# Altium PCB DriveWirePCB.PcbDoc (part 3 of 3)
Units mm, origin at the board's own origin, x right, y up, seen from the top; angles counter-clockwise.
Board outline 57.5 x 124.12 mm, 4 copper layers (Top Layer, GND, PWR, Bottom Layer), stack 1.57 mm thick; 111 components, 71 nets, 388 pads, 260 vias.
Unrouted connection lines stored in the file: 101.
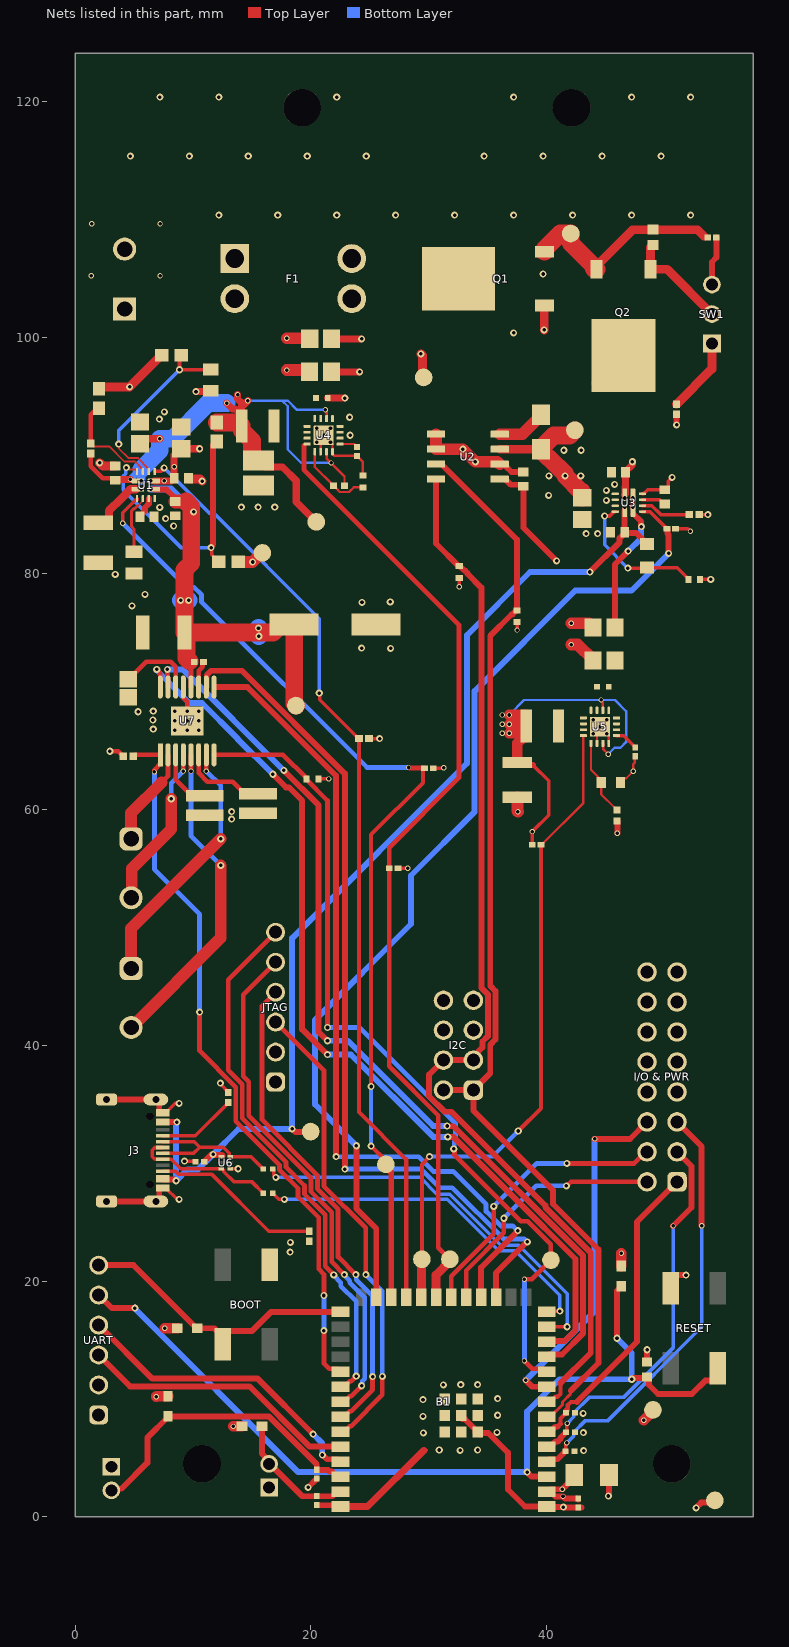
[diagram p4: the nets of this part, all layers, seen from the top]

## Via types
v1: diameter 0.6, hole 0.3, Top Layer to Bottom Layer, tented both sides, 160 vias
v2: diameter 0.45, hole 0.3, Top Layer to Bottom Layer, tented both sides, 56 vias
v3: diameter 0.6, hole 0.3, Top Layer to Bottom Layer, 26 vias
v4: diameter 0.5, hole 0.3, Top Layer to Bottom Layer, 10 vias
v5: diameter 0.4, hole 0.3, Top Layer to Bottom Layer, 8 vias

## Nets (pads, with @x,y where several pads share a name; then routed paths per layer and width w, separated by ;. In a path a pad name is that pad's centre, name@x,y a point inside that pad or via, vN(x,y) a via of type N, cw(c..) or ccw(c..) an arc to the next point about the centre after c; other vN are vias at no path point)
3V3: "I/O & PWR.8" "I/O & PWR.10" "I/O & PWR.12" "I/O & PWR.14" "I/O & PWR.16" B1.2 C8.1 C18.2 C23.2 C24.2 I2C.5 I2C.6 JTAG.2 L2.2 R4.1 R5.1 R12.2 R16.2 R18.2 R20.1 R21.2 R23.2 R24.2 R27.1 R28.1 R29.2 TP7.1 U2.5 U5.7 U5.14 UART.2 | length 62.3
  Top Layer w0.2: v2(44.6,69.275) 44.6,69.207 44.75,69.057 U5.14@44.75,68.4 ; U5.7@44.75,65.6 44.77,65.58 44.77,65.105 v2(45.2,64.675)
  Top Layer w0.3: R29.2@20.625,62.575 v2(21.5,62.575) ; R18.2@27.366,55 v2(28.2,55) ; R12.2@30.366,63.5 31.225,63.5 v2(31.25,63.525) ; v2(32.575,78.875) R4.1@32.575,79.625 ; v2(37.475,75.2) R5.1@37.475,75.875 ; R21.2@38.769,57 v2(38.769,58.119) 40.15,59.5 40.15,62.428 38.828,63.75 ; R16.2@50.906,83.8 51.95,83.8 v2(52.175,83.575)
  Top Layer w0.5: U2.5@36,88 36.475,88 36.95,87.525 37.875,87.525 C8.1@38,87.4 38,87.3 38.025,87.275 38.025,83.875 v1(40.825,81.075) ; C18.2@37.5,63.978 37.728,63.75 38.828,63.75 ; B1.2@40,2.15 40.3,2.15 40.713,1.737 v2(41.369,1.737) 41.531,1.575 42.572,1.575 C24.2@42.661,1.486 ; B1.2@40.3,2.35 v2(41.301,2.35) 42.325,3.374 C23.2@42.325,3.55 ; v2(45.975,57.975) 45.975,59.003 R20.1@45.986,59.014
  Top Layer w0.9: v2(6.875,10.2) 6.9,10.225 R28.1@7.875,10.225 ; v2(7.6,16) R23.2@8.65,16 ; v2(13.4,7.675) R27.1@14.15,7.675 ; v2(36.825,66.45) 38.225,66.45 L2.2@38.25,66.475 ; v2(36.825,67.225) 38.225,67.225 L2.2@38.25,67.2 ; v2(36.825,68) 38.225,68 38.25,67.975 L2.2@38.25,67.2 ; C18.2@37.5,63.978 37.5,65.598 38.027,66.125 38.225,66.125 38.25,66.15 L2.2@38.25,66.475 ; R24.2@46.3,21.275 46.3,22.325 v2(46.325,22.35) ; v2(48.225,8.2) 49,8.975 TP7.1@49,9.075 ; L2.2@38.25,66.475 L2.2@38.25,67.075 L2.2@38.25,67.2
  Bottom Layer w0.2: v2(36.825,68) 36.825,68.025 38.075,69.275 v2(44.6,69.275) 45.775,69.275 46.725,68.325 46.725,65.7 46.25,65.225 45.75,65.225 v2(45.2,64.675)
  other v2: 36.225,66.45 36.225,67.225 36.225,68
3V3_BUCK_IN: C19.1 C20.1 C21.1 U3.1 U3.8 U5.10 U5.11 U5.12 U5.13 | length 11.6
  Top Layer w0.5: C19.1@45.776,75.425 45.776,80.776 v1(46.9,81.9) ; v5(47.3,85.6) v5(47.3,86.4) ; U3.8@47.35,85.05 47.997,84.403 47.997,83.989 v1(48.016,83.97)
  Bottom Layer w0.5: v1(46.9,81.9) 47.997,82.997 47.997,83.95 v1(48.016,83.97)
3V3_PG: B1.22 R21.1 TP11.1 U5.4 | length 56.4
  Top Layer w0.2: R21.1@39.554,57 43.1,60.546 U5.4@43.1,66.25
  Top Layer w0.35: TP11.1@29.4,21.85 29.4,29.9 v1(30.05,30.55) ; v1(37.575,32.725) 39.5,34.65 R21.1@39.5,57
  Top Layer w0.75: B1.22@29.345,18.64 29.372,18.667 29.372,21.822 TP11.1@29.4,21.85
  Bottom Layer w0.35: v1(30.05,30.55) 35.4,30.55 v1(37.575,32.725)
6V: C2.2 C4.2 C16.1 L1.2 R1.2 R2.1 R17.1 TP5.1 U1.7 U4.7 U4.14 | length 56.8
  Top Layer w0.2: v2(21.225,93.875) 21.225,93.807 21.325,93.707 U4.14@21.325,93.125 ; U4.7@21.325,90.325 21.325,89.75 v2(21.7,89.375) 22.839,88.236 R17.1@22.839,87.45
  Top Layer w0.4: R1.2@1.325,90.175 1.325,89.1 2.35,88.075 3.225,88.075 C4.2@3.4,87.9
  Top Layer w0.6: C4.2@3.4,87.9 3.475,87.975 4.198,87.975 4.2,87.977 v2(4.693,87.977) ; C2.2@5.5,91 5.925,91.425 v2(7.175,91.425) ; v2(12.85,94.45) 13.348,93.952 13.598,93.952 14.125,93.425 14.125,94.45 13.775,94.8 v2(13.775,95.175) ; 14.3,94.3 v2(14.65,94.65) ; C16.1@15.55,89.576 16.101,89.024 17.587,89.024 18.75,87.861 18.75,86.075 TP5.1@20.45,84.375
  Top Layer w1.5: R2.1@12,92.801 13.85,92.801 14.125,92.526 L1.2@14.125,92.5 ; L1.2@14.125,92.125 14.997,91.253 14.997,89.677 15.098,89.576 C16.1@15.55,89.576
  Bottom Layer w0.2: v2(14.65,94.65) 17.55,94.65 ; v2(21.225,93.875) 18.825,93.875 18.05,94.65 17.55,94.65 ; v2(21.7,89.375) 19.175,89.375 18.025,90.525 18.025,94.175 17.55,94.65
  Bottom Layer w0.6: v2(4.693,87.977) 4.693,88.021 5.522,88.85 5.6,88.85
  Bottom Layer w0.7: v5(5.6,87.85) 5.6,88.85
  Bottom Layer w1.5: 5.6,88.85 7.175,90.425 v2(7.175,91.425) 8.275,91.425 11.3,94.45 v2(12.85,94.45)
6V_PG: B1.21 R18.1 TP9.1 U4.4 | length 82.7
  Top Layer w0.4: 19.4,90.85 19.4,88.8 32.55,75.65 32.55,62.675 26.634,56.759 R18.1@26.634,55 26.634,38.205 30.8,34.039 30.8,22.825 TP9.1@31.775,21.85
  Top Layer w0.75: B1.21@30.615,18.64 30.615,20.515 31.775,21.675 TP9.1@31.775,21.85
BOOST_SEL: B1.23 R9.2 U1.3 | length 80
  Top Layer w0.3: U1.3@6.75,88.65 7.25,88.65 v1(7.55,88.95) ; v1(20.7,69.85) 20.757,69.793 20.757,69.293 24.05,66 R9.2@24.075,66
  Top Layer w0.35: R9.2@24.075,66 24.075,34.325 28.075,30.325 B1.23@28.075,18.64
  Bottom Layer w0.3: v1(7.55,88.95) 11.442,85.058 11.815,85.058 20.7,76.174 v1(20.7,69.85)
BOOT: B1.27 BOOT.1 R23.1 UART.6 | length 24.5
  Top Layer w0.5: UART.6@2,21.35 4.95,21.35 10.3,16 R23.1@10.35,16 11.8,16 BOOT.1@12.5,15.3 ; BOOT.1@12.5,14.625 BOOT.1@12.5,15.3 ; B1.27@22.5,17.39 16.624,17.39 14.984,15.75 12.95,15.75 BOOT.1@12.5,15.3
ESP32_EN: B1.3 C28.2 R24.1 RESET.2 UART.5 | length 77.7
  Top Layer w0.5: UART.5@2,18.81 2.026,18.81 3.128,17.708 v1(5.075,17.708) ; v1(38.325,3.8) 38.705,3.42 B1.3@40,3.42 ; v1@45.95,15.177 45.95,19.175 46.3,19.525 R24.1@46.3,19.575 ; v1(47.2,11.675) 47.227,11.675 47.325,11.773 48.398,11.773 C28.2@48.5,11.875 48.543,11.875 48.668,11.75 48.668,11.182 49.425,10.425 52.3,10.425 53.432,11.557 54.05,11.557 54.5,12.007 RESET.2@54.5,12.625
  Bottom Layer w0.5: v1@5.075,17.775 5.075,17.641 18.916,3.8 v1(38.325,3.8) 38.325,8.925 41.075,11.675 v1(47.2,11.675) 47.2,13.9 v1(45.95,15.15)
GND: "I/O & PWR.7" "I/O & PWR.9" "I/O & PWR.11" "I/O & PWR.13" "I/O & PWR.15" B1.1 B1.40 B1.41 B1.42 B1.43 B1.44 B1.45 B1.46 B1.47 B1.48 B1.49 BOOT.4 C1.1 C2.1 C3.1 C4.1 C5.2 C6.1 C7.2 C8.2 C9.1 C10.1 C11.1 C12.2 C13.2 C14.2 C15.2 C16.2 C17.2 C18.1 C19.2 C20.2 C21.2 C22.2 C23.1 C24.1 C25.2 C26.2 C27.2 C28.1 C29.1 C30.1 C31.2 C32.1 C34.2 C35.1 I2C.7 I2C.8 J1.2 J2.1 J3.A1_B12 J3.B1_A12 J3.SH1 J3.SH2 J3.SH3 J3.SH4 J4.1 JTAG.1 Q1.1 R6.1 R7.1 R8.1 R9.1 R10.1 R13.1 R15.1 R19.2 R22.1 R30.2 R31.2 R32.1 R34.1 R35.2 R36.2 RESET.3 TP3.1 TP6.1 TP10.1 U1.12 U2.1 U2.2 U2.6 U3.3 U3.4 U3.5 U3.12 U4.6 U4.8 U4.15 U4.16 U4.17 U5.6 U5.8 U5.15 U5.16 U5.17 U6.4 U7.13 U7.17 UART.1 | length 109.9
  Top Layer w0.2: U4.6@20.825,90.325 20.825,91.475 v4(21.075,91.725) ; v4(21.655,91.145) 21.825,90.975 U4.8@21.825,90.325 21.825,90.145 21.999,89.971 C17.2@23.9,89.971 23.9,89.95 24.4,89.45 R19.2@24.4,88.3 ; U5.6@44.25,65.6 44.25,66.75 v4(44.5,67) ; v4(45.08,66.42) 45.25,66.25 U5.8@45.25,65.6 ; R22.1@46.245,62.275 46.245,62.345 46.54,62.64 46.74,62.64 v2(47.325,63.225) 47.325,63.822 47.445,63.942 47.445,64.445 C22.2@47.5,64.5
  Top Layer w0.3: J3.B1_A12@7.425,27.875 7.7,27.875 8.65,26.925 v1(8.825,26.925) ; J3.A1_B12@7.425,34.275 7.7,34.275 8.5,35.075 v1(8.825,35.075) ; v1(9.275,30.175) 9.3,30.15 10.168,30.15 C31.2@10.193,30.125 ; v1(12.325,36.79) 12.382,36.733 12.382,36.643 13,36.025 R36.2@13,36 ; U6.4@13.155,29.525 v1(13.825,29.525) ; R9.1@24.925,66 v1(25.825,66) ; 29.575,5.65 29.775,5.65 ; U3.12@48.1,86.75 48.2,86.75 48.55,87.1 C12.2@50,87.1 50.075,87.1 50.3,87.325 50.3,87.825 v1(50.625,88.15) ; R13.1@52.925,85 v1(53.65,85) ; R15.1@53,79.5 v1(53.9,79.5)
  Top Layer w0.4: v1(2.95,64.925) 3.65,64.925 R32.1@4.075,64.5 ; U7.13@9.175,70.375 9.179,70.371 9.179,69.462 9.5,69.141 v1(9.5,67.5)
  Top Layer w0.5: J3.SH4@2.67,26.755 J3.SH2@6.85,26.755 6.907,26.755 7.137,26.986 7.137,27.825 7.187,27.875 J3.B1_A12@7.425,27.875 ; J3.SH3@2.67,35.395 J3.SH1@6.85,35.395 6.907,35.395 7.137,35.164 7.137,34.325 7.187,34.275 J3.A1_B12@7.425,34.275 ; v1(19.75,2.5) 20.494,3.243 C30.1@20.5,3.243 ; C29.1@20.5,1 20.508,0.992 22.388,0.992 B1.40@22.5,0.88 ; B1.41@32.825,8.306 33.044,8.306 33.95,7.4 33.95,7.181 34.041,7.091 34.259,7.091 B1.43@34.35,7 ; B1.43@34.15,7.2 34.35,7.2 34.35,7.12 35.03,7.12 36.7,5.45 36.7,2.331 38.151,0.88 B1.1@40,0.88 40.036,0.844 41.381,0.844 v1(41.4,0.825) 41.427,0.825 41.456,0.796 C24.1@42.675,0.796 ; U2.6@36.475,89.27 36.525,89.22 36.525,89.086 37.011,88.6 C8.2@38,88.6 ; C24.1@42.675,0.8 42.95,0.8 ; v1(45.225,1.775) 45.278,1.828 C23.1@45.278,3.55 ; C28.1@48.5,13.125 v1(48.5,14.175) ; RESET.3@50.5,19.375 50.5,20.05 50.95,20.5 v1(51.8,20.5) ; v1(51,92.6) R34.1@51,93.5 ; v1(52.65,0.775) 53.084,1.209 54.059,1.209 TP10.1@54.25,1.4
  Top Layer w0.6: B1.40@22.5,0.88 24.805,0.88 29.575,5.65
  Top Layer w0.75: R6.1@2,95.825 v1(4.625,95.825) 7.3,98.5 R8.1@7.35,98.5 ; v1(2.075,89.375) 2.35,89.1 C4.1@3.4,89.1 ; C3.1@9.6,88.075 9.6,88 10.6,88 v1(10.775,87.825) ; v1(29.325,98.625) 29.45,98.5 29.45,96.725 TP3.1@29.55,96.625 ; v1(39.775,100.65) 39.775,102.695 Q1.1@39.8,102.72
  Top Layer w1: R10.1@13.825,81 13.85,80.975 14.458,80.975 v1(15.05,80.975) 15.825,81.75 TP6.1@15.875,81.75 ; v2(17.95,97.25) 19.724,97.25 C14.2@19.874,97.1 ; v2(17.95,99.95) 19.849,99.95 C13.2@19.899,99.9 ; U2.1@30.6,91.81 U2.2@30.6,90.54 v1(32.875,90.54) v1(33.945,89.47) 35.8,89.47 U2.6@36,89.27 ; C18.1@37.5,61.022 37.5,59.85 v2(37.55,59.8) ; v2(42.075,73.975) 42.625,73.975 43.924,72.676 C20.2@43.924,72.625 ; v2(42.075,75.775) 43.574,75.775 43.646,75.703 43.697,75.703 43.924,75.476 C19.2@43.924,75.425
  other v1: 43.125,5.625 32.65,5.65 30.875,5.675 34.125,5.675 29.525,7.125 43.1,7.15 35.775,7.175 29.5,8.525 35.825,8.625 43.075,8.775 29.5,9.95 35.825,10.025 31.225,11.2 32.7,11.225 34.125,11.225 18.225,22.45 18.25,23.275 13.275,59.175 13.275,59.8 8.45,66.7 9.5,66.7 10.5,66.7 6.625,66.8 8.45,67.5 10.475,67.5 6.6,67.575 5.35,68.275 6.625,68.325 8.45,68.325 9.5,68.32 10.475,68.325 26.75,73.65 24.3,73.675 4.825,77.25 24.325,77.55 26.725,77.6 5.925,78.225 3.4,79.925 43.325,83.375 44.3,83.375 8.35,84.025 7.675,84.65 7.175,85.6 14.1,85.625 15.525,85.625 16.925,85.625 45.05,86.2 45.05,87.05 45.75,87.55 7.139,93.086 7.575,93.7
  other v2: 1.375,105.255 7.2,105.255 1.4,109.655 7.2,109.655
  other v3: 37.184,100.395 39.684,105.395 12.184,110.395 17.184,110.395 22.184,110.395 27.184,110.395 32.184,110.395 37.184,110.395 42.184,110.395 47.184,110.395 52.184,110.395 4.684,115.395 9.684,115.395 14.684,115.395 19.684,115.395 24.684,115.395 34.684,115.395 39.684,115.395 44.684,115.395 49.684,115.395 7.184,120.395 12.184,120.395 22.184,120.395 37.184,120.395 47.184,120.395 52.184,120.395
  other v4: 43.92,66.42 43.92,67.58 45.08,67.58 20.495,91.145 20.495,92.305 21.655,92.305
I2C_SCL: B1.8 I2C.3 I2C.4 R4.2 U2.4 | length 91.6
  Top Layer w0.35: B1.8@40.3,9.77 40.72,10.19 40.916,10.19 41.15,10.424 41.15,11.325
  Top Layer w0.5: U2.4@30.6,88 30.6,82.55 32.525,80.625 32.625,80.625 32.975,80.275 33.041,80.275 33.275,80.041 33.275,79.975 34.45,78.8 34.45,44.862 34.995,44.317 34.995,40.763 34.55,40.318 34.55,39.821 33.77,39.041 I2C.3@33.77,38.73 I2C.4@31.23,38.73 30.005,37.505 30.005,35.683 31.33,34.358 31.922,34.358 39.872,26.408 39.872,26.266 43.725,22.413 43.725,13.9 41.15,11.325 ; B1.8@40,9.77 B1.8@40.3,9.77
I2C_SDA: B1.7 I2C.1 I2C.2 R5.2 U2.3 | length 94.8
  Top Layer w0.25: B1.7@40,8.5 40.3,8.5 40.795,8.995 40.814,8.995 41.325,9.506 41.325,9.753 42.025,10.453 42.025,10.7
  Top Layer w0.5: U2.3@30.6,89.27 31.075,89.27 37.475,82.87 R5.2@37.475,76.875 37.425,76.875 37.075,76.525 37.009,76.525 35.2,74.716 35.2,45.032 35.645,44.587 35.645,40.493 35.2,40.048 35.2,37.62 I2C.1@33.77,36.19 ; I2C.2@31.23,36.19 I2C.1@33.77,36.19 ; 42.025,10.7 44.375,13.05 44.375,22.683 40.522,26.536 40.522,27.705 33.77,34.458 I2C.1@33.77,36.19
IO4: "I/O & PWR.5" B1.4 C25.1 | length 36.6
  Top Layer w0.3: C25.1@41.596,5.575 41.596,6.171 v2(41.7,6.275)
  Top Layer w0.5: B1.4@40,4.69 40.2,4.89 40.911,4.89 41.583,5.561 41.589,5.561 41.596,5.569 C25.1@41.596,5.575 ; 51.04,33.5 53.125,31.415 v2(53.125,24.7)
  Bottom Layer w0.3: v2(41.7,6.275) 42.29,6.865 42.29,7.189 43.276,8.175 45.185,8.175 53.125,16.115 v2(53.125,24.7)
IO5: "I/O & PWR.3" B1.5 C26.1 | length 32.6
  Top Layer w0.3: C26.1@41.621,7.175 41.696,7.25 41.696,7.896 v2(41.725,7.925)
  Top Layer w0.5: B1.5@40,5.96 40.3,5.96 40.72,6.38 40.916,6.38 41.15,6.614 41.15,6.697 41.621,7.169 C26.1@41.621,7.175 ; v2(50.7,24.675) 52.265,26.24 52.265,29.735 51.04,30.96
  Bottom Layer w0.3: v2(41.725,7.925) 42.29,8.49 42.29,8.839 43.584,10.133 46.506,10.133 50.7,14.326 v2(50.7,24.675)
IO6: "I/O & PWR.1" B1.6 C27.1 | length 26.3
  Top Layer w0.35: 41.15,7.884 41.15,8.351 C27.1@41.618,8.819 ; 41.7,9.067 41.775,9.142 41.775,9.485 42.04,9.75 42.543,9.75
  Top Layer w0.4: 40.916,7.65 41.15,7.884
  Top Layer w0.5: B1.6@40,7.23 40.3,7.23 40.72,7.65 40.916,7.65 ; C27.1@41.618,8.825 41.626,8.833 41.626,8.992 41.7,9.067 ; 42.543,9.75 47.645,14.852 47.645,25.025 51.04,28.42
IO11: "I/O & PWR.2" B1.19 | length 21.4
  Top Layer w0.4: B1.19@33.155,18.64 33.155,20.897 36.35,24.092 v1(36.35,25.325) ; v1(41.65,28.075) 41.704,28.075 42.049,28.42 48.5,28.42
  Bottom Layer w0.4: v1(36.35,25.325) 39.1,28.075 v1(41.65,28.075)
IO12: "I/O & PWR.4" B1.20 | length 24.1
  Top Layer w0.4: B1.20@31.885,18.64 31.885,20.404 35.5,24.019 v1(35.5,26.325) ; v1(41.7,29.975) 47.393,29.975 48.378,30.96 48.5,30.96
  Bottom Layer w0.4: v1(35.5,26.325) 39.15,29.975 v1(41.7,29.975)
IO16: "I/O & PWR.6" B1.9 | length 30
  Top Layer w0.5: v2(38.2,11.6) 38.76,11.04 B1.9@40,11.04 ; v2(44.05,32.05) 47.05,32.05 48.5,33.5
  Bottom Layer w0.5: v2(38.2,11.6) 44.05,17.45 v2(44.05,32.05)
IO39: B1.32 JTAG.6 | length 45.5
  Top Layer w0.4: JTAG.6@17,49.58 12.975,45.555 12.975,37.873 14.175,36.673 14.175,33.798 17.875,30.098 17.875,29.675 19.45,28.1 19.45,27.368 21.2,25.618 21.2,21.256 v1(21.928,20.528) ; B1.32@22.5,11.04 22.8,11.04 23.27,11.51 23.407,11.51 v1(23.836,11.939)
  Bottom Layer w0.4: v1(21.928,20.528) 21.928,20.474 22.531,19.871 22.531,19.575 23.836,18.27 v1(23.836,11.939)
IO40: B1.33 JTAG.5 | length 43.8
  Top Layer w0.4: JTAG.5@17,47.04 14.25,44.29 14.25,37.376 14.725,36.901 14.725,34.026 20,28.751 20,27.596 21.75,25.846 21.75,21.625 v1(22.825,20.55) ; B1.33@22.5,9.77 22.8,9.77 23.27,10.24 23.415,10.24 v1(24.3,11.125)
  Bottom Layer w0.4: v1(22.825,20.55) 22.825,20.496 23.288,20.033 23.288,19.862 24.55,18.6 24.55,11.734 24.338,11.522 24.338,11.163 v1(24.3,11.125)
IO41: B1.34 JTAG.4 | length 41.7
  Top Layer w0.4: JTAG.4@17,44.5 15.85,43.35 15.85,33.678 20.55,28.978 20.55,27.824 22.3,26.074 22.3,22.05 v1(23.8,20.55) ; B1.34@22.5,8.5 22.8,8.5 23.27,8.97 23.395,8.97 25.225,10.8 v1(25.225,11.9)
  Bottom Layer w0.4: v1(23.8,20.55) 23.838,20.512 23.838,20.112 25.225,18.725 v1(25.225,11.9)
IO42: B1.35 JTAG.3 | length 40.2
  Top Layer w0.4: JTAG.3@17,41.96 21.1,37.86 21.1,28.051 24.65,24.501 v1(24.65,20.55) ; B1.35@22.5,7.23 22.8,7.23 23.27,7.7 23.395,7.7 26.05,10.355 v1(26.05,11.925)
  Bottom Layer w0.4: v1(24.65,20.55) 26.05,19.15 v1(26.05,11.925)
LOGIC_MUX_STATUS: B1.25 R16.1 U3.9 | length 85.3
  Top Layer w0.3: U3.9@48.1,85.25 48.725,85.25 50.034,83.941 50.034,83.886 R16.1@50.121,83.8
  Top Layer w0.5: v1(23.85,31.475) 23.85,26.15 25.535,24.465 B1.25@25.535,18.64 ; R16.1@50.121,83.8 50.216,83.705 50.216,83.398 50.325,83.289 v1(50.325,81.7)
  Bottom Layer w0.5: v1(23.85,31.475) 20.35,34.975 20.35,42.15 28.475,50.275 28.475,54.391 33.875,59.791 33.875,70.025 42.412,78.562 47.188,78.562 v1(50.325,81.7)
MOTOR_BUS: C5.1 C6.2 C32.2 C33.2 C35.2 TP2.1 U1.1 U1.8 U7.12 | length 46.9
  Top Layer w0.4: 9.7,72.55 9.825,72.425 U7.12@9.825,70.375
  Top Layer w0.5: U1.1@6.675,87.15 6.7,87.125 7.741,87.125 8.3,86.566 8.3,86.225 8.425,86.1 C6.2@8.5,86.1
  Top Layer w0.7: C5.1@1.975,84.3 2.6,84.3 2.875,84.575 2.875,85.325 3.924,86.374 4.7,87.15 4.997,87.15 U1.8@5.15,87.15
  Top Layer w1.2: C6.2@8.5,86.1 9.398,86.1
  Top Layer w1.5: 9.398,86.1 9.85,85.648 9.85,80.876 9.275,80.301 C35.2@9.275,75 ; 9.7,72.55 9.448,72.802 9.448,74.827 C35.2@9.275,75 ; TP2.1@18.725,68.8 18.575,68.95 C32.2@18.575,75.675 17.45,75.675 16.775,75 C35.2@9.275,75
  Bottom Layer w0.6: v5(6.4,87.15) 8.125,87.15 v1(10.05,85.225)
  Bottom Layer w1.5: v1(8.95,77.725) v1(9.625,77.725) ; v1(15.55,75.375) 15.575,75.35 v1(15.575,74.675)
  other v5: 5.6,87.15
MOTOR_L_IN1: B1.12 U7.16 | length 78.2
  Top Layer w0.4: v1(6.925,71.875) 6.925,71.821 7.221,71.525 7.221,70.379 U7.16@7.225,70.375
  Top Layer w0.5: v1(16.775,62.975) 17.896,61.854 18.152,61.854 19.254,60.751 19.254,41.346 v1(21.4,39.2) ; v1(31.6,32.225) 31.619,32.206 32.094,32.206 37.272,27.028 42.425,21.875 42.425,15.835 41.5,14.91 40.06,14.91 B1.12@40,14.85
  Bottom Layer w0.5: v1(6.925,71.875) 6.944,71.856 6.944,71.766 9.685,69.025 10.765,69.025 13.76,66.03 13.76,65.99 v1(16.775,62.975) ; v1(21.4,39.2) 23.39,39.2 30.365,32.225 v1(31.6,32.225)
MOTOR_L_IN2: B1.11 U7.15 | length 79.1
  Top Layer w0.4: v1(7.825,71.875) 7.825,71.198 7.875,71.148 U7.15@7.875,70.375
  Top Layer w0.5: v1(17.698,63.298) 20.65,60.346 20.65,41.125 v1(21.4,40.375) ; v1(31.549,33.149) 31.568,33.13 32.09,33.13 43.075,22.144 43.075,15.566 41.289,13.78 40.2,13.78 B1.11@40,13.58
  Bottom Layer w0.5: v1(7.825,71.875) 9.121,71.875 v1(17.698,63.298) ; v1(21.4,40.375) 23.134,40.375 30.36,33.149 v1(31.549,33.149)
MOTOR_L_TEMP_ADC: B1.39 C29.2 J4.2 R27.2 | length 10.8
  Top Layer w0.5: R27.2@15.85,7.675 15.85,5.371 16.45,4.771 J4.2@16.45,4.5 16.516,4.5 19.259,1.757 C29.2@20.5,1.757 21.807,1.757 22.2,2.15 B1.39@22.5,2.15
MOTOR_MUX_STATUS: B1.24 R12.1 TP12.1 U1.9 | length 84.7
  Top Layer w0.3: v2(4.05,84.25) 4.05,85.165 5.085,86.2 5.2,86.2 5.25,86.25 U1.9@5.25,86.35
  Top Layer w0.35: v1(25.1,31.45) 26.35,30.2 TP12.1@26.35,29.9 ; v1(25.1,36.5) 25.1,57.85 29.5,62.25 29.5,63.366 29.519,63.384 29.519,63.439 29.58,63.5 R12.1@29.634,63.5
  Top Layer w0.4: v2(28.275,63.55) 28.289,63.55 28.339,63.5 R12.1@29.634,63.5
  Top Layer w0.5: TP12.1@26.35,29.9 26.35,29.629 26.805,29.174 B1.24@26.805,18.64
  Bottom Layer w0.35: v1(25.1,31.45) v1(25.1,36.5)
  Bottom Layer w0.4: v2(4.05,84.25) 9.475,78.825 10.081,78.825 10.725,78.181 10.725,77.575 24.75,63.55 v2(28.275,63.55)
MOTOR_R_IN1: B1.18 U7.9 | length 71
  Top Layer w0.5: U7.9@11.85,70.375 14.604,70.375 22.125,62.854 v1(22.125,30.55) ; B1.18@34.425,18.64 34.425,21.15 v1(37.55,24.275)
  Bottom Layer w0.4: v1(22.125,30.55) 29.131,30.55 30.381,29.3 32.057,29.3 34.85,26.507 34.85,25.906 36.081,24.675 37.096,24.675 37.496,24.275 v1(37.55,24.275)
MOTOR_R_IN2: B1.17 U7.10 | length 73.9
  Top Layer w0.5: U7.10@11.125,70.375 11.165,70.415 11.165,71.396 11.522,71.753 14.146,71.753 22.875,63.024 v1(22.875,29.5) ; B1.17@35.695,18.64 35.695,20.695 38.325,23.325 v1(38.35,23.325)
  Bottom Layer w0.4: v1(22.875,29.5) 29.332,29.5 30.907,27.925 31.982,27.925 36.332,23.575 38.073,23.575 v1@38.323,23.325
  Bottom Layer w0.5: v1@38.323,23.325 v1(38.35,23.325)
MOTOR_R_TEMP_ADC: B1.38 C30.2 J2.2 R28.2 | length 25.8
  Top Layer w0.5: J2.2@2.95,2.25 3.09,2.39 3.931,2.39 6.125,4.583 6.125,6.725 7.875,8.475 R28.2@7.875,8.525 16.416,8.525 20.486,4.454 20.486,4.008 20.494,4 C30.2@20.5,4 20.508,3.992 21.432,3.992 21.584,3.84 21.78,3.84 22.2,3.42 B1.38@22.5,3.42
NetC7_1: C7.1 U1.11 | length 1.9
  Top Layer w0.5: C7.1@5.5,84.8 5.5,84.875 5.925,85.3 5.925,85.589 6.25,85.914 U1.11@6.25,86.35
NetC12_1: C12.1 U3.11 | length 2
  Top Layer w0.3: U3.11@48.1,86.25 49.575,86.25 49.925,85.9 C12.1@50,85.9
NetC17_1: C17.1 U4.9 | length 1.5
  Top Layer w0.2: U4.9@22.475,90.975 23.675,90.975 23.9,90.75 C17.1@23.9,90.729
NetC22_1: C22.1 U5.9 | length 2
  Top Layer w0.3: U5.9@45.9,66.25 46.529,66.25 47.5,65.279 C22.1@47.5,65.257
NetC33_1: C33.1 U7.11 | length 2.3
  Top Layer w0.4: U7.11@10.475,70.375 10.475,71.769 10.81,72.104 10.81,72.44 10.87,72.5 C33.1@10.89,72.5
NetC34_1: C34.1 U7.14 | length 6.5
  Top Layer w0.4: C34.1@4.5,71.028 4.539,71.028 6.036,72.525 8.094,72.525 8.525,72.094 U7.14@8.525,70.375
NetC36_1: C36.1 Q2.1 SW1.2 | length 8.9
  Top Layer w0.75: C36.1@49,107.85 48.975,107.85 48.78,107.655 Q2.1@48.78,105.8 50.2,105.8 SW1.2@54,102
NetJ3_A5: J3.A5 R36.1 | length 6.8
  Top Layer w0.3: J3.A5@7.425,32.325 10.2,32.325 13,35.125 R36.1@13,35.15
NetJ3_A6: J3.A6 J3.B6 R25.1 U6.3 | length 12.3
  Top Layer w0.3: J3.A6@7.425,31.325 6.776,31.325 6.55,31.099 6.55,30.551 6.776,30.325 J3.B6@7.425,30.325 8.15,30.325 8.95,29.525 U6.3@12.385,29.525 12.48,29.525 12.61,29.395 12.61,29.28 13.487,28.402 14.998,28.402 R25.1@15.95,27.45
NetJ3_A7: J3.A7 J3.B7 R26.1 U6.6 | length 13
  Top Layer w0.3: J3.A7@7.425,30.825 10.04,30.825 10.565,31.35 ; J3.B7@7.425,31.825 10.09,31.825 10.565,31.35 ; U6.6@13.155,30.525 13.06,30.525 13.06,30.853 12.563,31.35 10.565,31.35 ; U6.6@13.16,30.525 14.925,30.525 R26.1@15.95,29.5
NetJ3_B5: J3.B5 R35.1 | length 14.5
  Top Layer w0.3: J3.B5@7.425,29.325 8.514,29.325 8.764,29.075 11.562,29.075 16.413,24.225 R35.1@19.85,24.225
NetJ5_1: J5.1 U7.2 | length 8.4
  Top Layer w0.4: 7.325,62.275 7.875,62.825 U7.2@7.875,64.625
  Top Layer w1: J5.1@4.75,57.5 4.75,59.7 7.325,62.275
NetJ5_2: J5.2 U7.4 | length 14
  Top Layer w0.4: v2(9.175,63.25) U7.4@9.175,64.625
  Top Layer w1: J5.2@4.75,52.5 4.809,52.559 4.809,54.975 8.15,58.316 v1(8.15,60.9)
  Bottom Layer w0.4: v1(8.15,60.9) 8.15,62.225 v2(9.175,63.25)
NetJ6_1: J6.1 U7.7 | length 21.8
  Top Layer w0.4: v2(11.125,63.25) U7.7@11.125,64.625
  Top Layer w1: J6.1@4.75,46.5 4.75,49.9 v1(12.35,57.5)
  Bottom Layer w0.4: v2(11.125,63.25) 12.35,62.025 v1(12.35,57.5)
NetJ6_2: J6.2 U7.5 | length 27.3
  Top Layer w0.4: v2(9.825,63.25) U7.5@9.825,64.625
  Top Layer w1: J6.2@4.75,41.5 12.35,49.1 v1(12.35,55.25)
  Bottom Layer w0.4: v2(9.825,63.25) 9.825,57.775 v1(12.35,55.25)
NetL1_1: L1.1 U4.1 U4.2 U4.3
NetL2_1: L2.1 U5.1 U5.2 U5.3
NetR1_1: R1.1 R6.2 U1.5 | length 9
  Top Layer w0.15: R1.1@1.325,91.025 1.325,91 1.55,90.775 2.9,90.775 4.175,89.5 5.089,89.5 5.575,89.014 5.575,88.963 5.663,88.875 5.725,88.875 5.75,88.85 U1.5@5.75,88.65
  Top Layer w0.4: R1.1@1.325,91.025 1.325,93.45 2,94.125 R6.2@2,94.175
NetR2_2: R2.2 R10.2 U1.6 | length 23.3
  Top Layer w0.15: v1(4.35,88.975) 4.472,88.975 4.622,88.825 5.225,88.825 5.25,88.8 U1.6@5.25,88.65
  Top Layer w0.3: 11.7,82.456 11.525,82.281 v1(11.525,82.2) 11.582,82.143 11.582,81.593 11.75,81.425 11.75,81.375 12.125,81 R10.2@12.175,81 ; R2.2@11.7,90.899 R2.2@12,91.199
  Top Layer w0.5: 11.7,82.456 R2.2@11.7,90.899
  Bottom Layer w0.3: v1(4.35,88.975) 4.293,88.918 4.293,88.469 4.093,88.269 4.093,87.084 8.976,82.2 v1(11.525,82.2)
NetR3_1: R3.1 R8.2 U1.4 | length 16.2
  Top Layer w0.15: v1(3.7,90.975) 3.7,90.6 4.5,89.8 5.3,89.8 6.25,88.85 U1.4@6.25,88.65
  Top Layer w0.3: R8.2@9,98.5 8.85,98.35 v1(8.85,97.275) 11.475,97.275 R3.1@11.5,97.3
  Bottom Layer w0.3: v1(3.7,90.975) 3.7,92.125 v1(8.85,97.275)
NetR7_2: R7.2 U1.10 | length 5
  Top Layer w0.15: 5.291,85.734 5.334,85.734 5.75,86.15 U1.10@5.75,86.35
  Top Layer w0.25: R7.2@5,81.851 5,83.773 4.8,83.973 4.8,85.314 5.011,85.525 5.082,85.525 5.291,85.734
NetR13_2: R13.2 U3.10 | length 4.3
  Top Layer w0.3: U3.10@48.1,85.75 48.901,85.75 49.651,85 R13.2@52.075,85
NetR14_1: R14.1 R15.2 U3.6 | length 11.9
  Top Layer w0.3: v1(44.9,84.875) 45.325,84.875 45.7,85.25 U3.6@45.8,85.25 ; v1(46.875,80.45) 48.45,80.45 R14.1@48.5,80.5 51.05,80.5 52,79.55 R15.2@52,79.5
  Bottom Layer w0.3: v1(44.9,84.875) 44.9,82.425 v1(46.875,80.45)
NetR17_2: R17.2 R19.1 U4.5 | length 6.4
  Top Layer w0.2: U4.5@20.325,90.325 20.325,89.028 21.903,87.45 R17.2@21.911,87.45 21.918,87.45 22.295,87.073 22.295,87.06 22.442,86.914 23.236,86.914 23.623,87.3 R19.1@24.4,87.3
NetR20_2: R20.2 R22.2 U5.5 | length 6.5
  Top Layer w0.2: U5.5@43.75,65.6 43.75,63.36 R22.2@44.685,62.425 ; R22.2@44.605,62.275 44.605,61.284 45.756,60.133 45.764,60.133 45.95,59.947 R20.2@45.95,59.939
NetR30_1: R30.1 U7.3 | length 5.2
  Top Layer w0.4: U7.3@8.525,64.625 8.525,62.5 9.875,61.15 R30.1@11,61.15
NetR31_1: R31.1 U7.6 | length 7.3
  Top Layer w0.4: U7.6@10.475,64.625 10.479,64.621 10.479,63.083 11.22,62.341 13.359,62.341 14.375,61.325 R31.1@15.5,61.325
NetR33_1: R33.1 SW1.3 | length 4.2
  Top Layer w0.5: SW1.3@54,104.5 54,106.414 54.375,106.789 R33.1@54.375,108.5
NetR34_2: R34.2 SW1.1 | length 6.4
  Top Layer w0.75: R34.2@51,94.35 54,97.35 SW1.1@54,99.5
nFAULT: B1.10 R29.1 TP8.1 U7.8 | length 72.3
  Top Layer w0.4: U7.8@11.775,64.625 17.625,64.625 19.625,62.625 R29.1@19.625,62.575 19.625,62.525 21.4,60.75 v1(21.4,41.5) ; v1(32.105,31.205) 32.105,31.151 32.175,31.081 32.175,30.675 37.787,25.063 38.388,25.063 40.326,23.125 40.326,21.799 TP8.1@40.35,21.775 38.735,20.16 38.11,20.16 v2(38.1,20.15) ; v2(38.1,13.225) 38.765,12.56 39.75,12.56 B1.10@40,12.31
  Bottom Layer w0.4: v1(21.4,41.5) 24.117,41.5 32.25,33.367 32.25,31.956 32.143,31.849 32.143,31.243 v1(32.105,31.205) ; v2(38.1,13.225) v2(38.1,20.15)
nSLEEP: B1.31 R32.2 U7.1 | length 61.8
  Top Layer w0.4: R32.2@4.925,64.5 4.95,64.5 5.075,64.625 U7.1@7.225,64.625 7.225,63.857 6.735,63.367 6.735,63.185 v2(6.725,63.175) ; v1(10.55,42.8) 10.55,39.52 13.625,36.445 13.625,33.57 17.325,29.87 17.325,29.447 18.9,27.872 18.9,27.14 20.65,25.39 20.65,21.028 21.1,20.578 v1(21.1,18.775) ; v1(21.1,15.8) 21.1,13.014 21.554,12.56 22.25,12.56 B1.31@22.5,12.31
  Bottom Layer w0.4: v2(6.725,63.175) 6.725,54.92 10.55,51.095 v1(10.55,42.8) ; v1(21.1,15.8) v1(21.1,18.775)
UART0_RX: B1.36 UART.3 | length 23.7
  Top Layer w0.5: UART.3@2,13.73 4.655,11.075 14.785,11.075 19.9,5.96 B1.36@22.5,5.96
UART0_TX: B1.37 UART.4 | length 25.9
  Top Layer w0.5: UART.4@2,16.27 6.545,11.725 15.475,11.725 v1(20.175,7.025) ; v1(20.975,5.25) 21.002,5.25 21.362,4.89 22.3,4.89 B1.37@22.5,4.69
  Bottom Layer w0.5: v1(20.175,7.025) 20.956,6.244 20.956,5.269 v1(20.975,5.25)
USB_D+: B1.14 R25.2 | length 30.4
  Top Layer w0.3: R25.2@16.75,27.45 17.275,26.925 v1(17.75,26.925) ; B1.14@40,17.39 40.06,17.45 v1(41.1,17.45)
  Bottom Layer w0.3: v1(17.75,26.925) 31.568,26.925 35.918,22.575 37.325,22.575 41.1,18.8 v1(41.1,17.45)
USB_D-: B1.13 R26.2 | length 34.1
  Top Layer w0.3: R26.2@16.75,29.5 16.825,29.425 16.825,29 v1(17.025,28.8) ; B1.13@40,16.12 40.005,16.125 v1(41.725,16.125)
  Bottom Layer w0.3: v1(17.025,28.8) 29.254,28.8 30.679,27.375 31.754,27.375 36.104,23.025 37.625,23.025 41.725,18.925 v1(41.725,16.125)
USB_VBUS: C10.2 C31.1 J3.A4_B9 J3.B4_A9 R14.2 TP13.1 U3.7 U6.1 | length 92
  Top Layer w0.5: J3.B4_A9@7.425,28.675 7.475,28.625 8.423,28.625 8.54,28.508 v1(8.567,28.508) ; J3.A4_B9@7.425,33.475 v1(8.625,33.475) ; C31.1@10.958,30.139 11.55,30.731 11.681,30.731 v1(11.7,30.75) 11.727,30.75 11.771,30.706 12.429,30.706 U6.1@12.51,30.625 ; v1(18.4,32.9) 18.427,32.9 18.702,32.625 TP13.1@19.95,32.625 ; v1(43.65,80.125) 46.175,82.65 46.175,83 46.6,83.425 C10.2@46.6,83.5 ; U3.7@46.6,85.325 C10.2@46.6,83.5 ; R14.2@48.5,82.5 48.4,82.5 48.15,82.75 48.15,82.85 47.569,83.431 46.669,83.431 C10.2@46.6,83.5
  Bottom Layer w0.5: v1(8.625,33.475) 8.625,33.448 8.567,33.39 v1(8.567,28.508) 9.534,29.475 10.425,29.475 v1(11.7,30.75) 13.85,32.9 v1(18.4,32.9) 18.4,49.075 33.225,63.9 33.225,74.775 38.575,80.125 v1(43.65,80.125)
  other v5: 46.6,85.6
VBAT_BUS: C1.2 C3.2 C9.2 C11.2 C13.1 C14.1 C15.1 R3.2 R11.2 TP4.1 U1.2 U2.7 U3.2 U4.10 U4.11 U4.12 U4.13 | length 29.5
  Top Layer w0.6: U1.2@6.675,87.85 8.175,87.85 8.25,87.925 8.325,87.925 8.4,88 C3.2@8.4,88.075 v2(8.4,89.05) 8.4,90.025 8.949,90.574 C1.2@9,90.574 v1@10.549,90.574 ; v1(10.25,95.425) 11.425,95.425 R3.2@11.5,95.5 ; C15.1@21.425,94.875 v1(22.875,94.875) ; C14.1@21.726,97.1 v1(24.125,97.1) ; C13.1@21.751,99.9 v1(24.3,99.9) ; R11.2@39.485,90.54 R11.2@39.5,90.525 ; U3.2@46.6,86.675 46.65,86.725 46.65,87.357 46.675,87.382 C9.2@46.675,88.575 46.675,88.65 47.25,89.225 v1(47.25,89.475)
  Top Layer w0.7: U2.7@36,90.54 R11.2@39.485,90.54
  Top Layer w1.2: C11.2@42.972,86.448 C11.2@42.972,86.953
  Top Layer w1.5: R11.2@39.5,90.425 40.109,89.816 40.175,89.816 41.55,88.441 v1(41.55,88.275) 42.872,86.953 C11.2@42.972,86.953 ; R11.2@39.5,90.625 40.575,91.7 41.925,91.7 TP4.1@42.375,92.15 ; C11.2@42.972,86.448 42.995,86.426 C11.2@43,86.426
  other v1: 40.15,86.625 40.175,88.275 42.875,88.275 41.45,90.45 42.9,90.45 10.55,90.575 23.325,91.725 23.275,93.25
  other v2: 7.55,87.85
  other v5: 46.6,86.4 6.4,87.85
VBAT_FUSED: F1.2 Q1.3 | length 2.4
  Top Layer w1.5: Q1.3@30.8,103.3 Q1.3@32.5,105
VBAT_PROTECTED: C36.2 Q1.2 Q2.2 R33.2 TP1.1 | length 17.9
  Top Layer w0.75: Q2.2@44.22,105.8 44.22,106.1 47.27,109.15 C36.2@49,109.15 52.775,109.15 53.325,108.6
  Top Layer w1.5: Q1.2@39.8,107.28 39.8,107.48 41.145,108.825 TP1.1@42.025,108.825 42.025,107.995 43.97,106.05 43.97,105.85 44.02,105.8 Q2.2@44.22,105.8
VBAT_RAW: F1.1 J1.1 | length 0.3
  Top Layer w1.5: F1.1@13.283,103.3 F1.1@13.54,103.3
VBAT_SWTCH: Q2.3 R11.1 U2.8 | length 7.4
  Top Layer w1: U2.8@36,91.81 37.935,91.81 39.5,93.375 R11.1@39.5,93.475
  Top Layer w1.5: Q2.3@44.55,96.15 46.5,98.1 Q2.3@46.5,98.5
pads on no net: B1.15 B1.16 B1.26 B1.28 B1.29 B1.30 BOOT.2 BOOT.3 J3. J3.A8 J3.B8 RESET.1 RESET.4 U6.2 U6.5

## Polygon pours and split planes (outlines as drawn)
VBAT_BUS on PWR "VBAT_BUS_L03_P000" (solid, remove dead copper, pour order 0): 0.8,85.3 0.8,99.425 35.075,101.225 46.2,90.1 54.275,90.1 52.025,85.1 48.25,82.575 20.025,82.575 20,82.55
3V3 on PWR "3V3_L03_P002" (solid, remove dead copper, pour order 2): 57.05,84.425 56.975,84.35 51.05,84.35 48.475,81.775 17.675,81.775 17.325,82.125 0.025,82.125 0.025,0.225 0.25,0 0.3,0.05 57.45,0.05 57.45,84.4 57.425,84.425
GND on Bottom Layer "GND_L04_P003" (solid, remove dead copper, pour order 3): 0.9,123.25 0.825,123.175 0.825,0.65 56.775,0.65 56.5,0.925 56.5,123.25
GND on GND (split plane): 56.99,0.51 0.51,0.51 0.51,123.615 56.99,123.615

## Other copper
Top Layer:
  rectangle net GND: 44.725,85.625 46.05,89.05
  rectangle net GND: 42.1,5.075 43.5,9.35
  rectangle net GND: 23.413,72.975 27.625,78.26
  rectangle net GND: 13.575,85.05 17.65,88.325
  rectangle net GND: 6.65,84.4 7.625,86.675
  rectangle net GND: 0.65,104.625 8.225,110.5
  rectangle net GND: 6.325,83.7 8.85,85.275
  rectangle net GND: 28.7,4.775 36.95,11.875
  rectangle net GND: 9.375,58.85 17.325,60.125
  rectangle net GND: 15.775,21.925 20.3,23.775
  rectangle net 3V3: 35.95,66 37.325,68.444
  rectangle net VBAT_BUS: 39.425,85.75 43.75,91.95
  rectangle net MOTOR_BUS: 4.8,86.925 7.2,87.375
  rectangle net VBAT_FUSED: 22.15,101.9 35.675,108.4
  region net GND: 42.8,76.6 44.65,76.6 44.65,71.175 44.5,71.025 44.5,69.9 44.175,69.575 44.175,68.875 44.375,68.675 44.35,68.65 44.35,67.55 43.625,67.55 43.625,71.375 42.8,72.225 42.8,72.275
  region net GND: 42.225,85.275 43.775,85.275 43.775,84.5 44.325,83.95 45.775,83.95 45.775,83.05 45.75,83.025 43.05,83.025 42.225,83.85
  region net GND: 20.725,95.2 20.725,94.45 20.725,93.425 20.75,93.4 20.75,93.375 20.95,93.375 20.95,92.225 20.125,92.225 20.125,95.2
  region net GND: 20.725,95.2 20.6,95.325 20.6,100.85 20.625,100.875 20.55,100.95 18.875,100.95 18.875,96.2 18.85,96.175 19.65,95.375 19.65,93.8 20.325,93.125
  region net GND: 4.75,93.575 6.475,93.575 7,94.1 7.7,94.1 8.65,93.15 9.775,93.15 9.775,91.725 9.75,91.7 8,91.7 7.575,92.125 4.725,92.125
  region net GND: 0.725,81.525 0.7,81.5 0.7,80.3 2.275,80.3 4.5,78.075 4.5,73.55 6.25,73.55 6.275,73.525 6.3,73.55 6.3,78.9 5.7,79.5 5.7,80.525 4.35,80.525 3.35,81.525 3.225,81.525
  region net GND: 3.75,70.175 5.225,70.175 5.225,69.675 5.2,69.65 6.1,68.75 10.85,68.75 10.875,68.725 10.875,66.275 6.475,66.275 3.925,68.825 3.775,68.825
  region net VBAT_SWTCH: 49.15,101.625 43.8,101.625 43.775,101.65 38.7,96.575 38.7,92.575 39.675,92.575 40.3,93.2 40.3,93.9 41.775,95.375 49.2,95.375
  region net VBAT_PROTECTED: 39,108.3 39,106.275 42.35,106.275 43.7,104.925 45.475,104.925 45.475,106.875 42.775,109.575 40.2,109.575
  region net VBAT_RAW: 1.725,103.45 1.725,100.675 13.2,100.675 14.775,102.5 14.775,107.925 12.775,107.925 8.3,103.45
  region net NetL1_1: 19.775,92.725 19.85,92.65 19.85,91.3 17.55,91.3 17.35,91.1 16.4,91.1 16.4,93.9 18.025,93.9 19.2,92.725
  region net NetL2_1: 43.4,67.875 42.075,67.875 41.475,68.475 40.525,68.475 40.525,65.675 41.475,65.675 42.425,66.625 43.4,66.625
  region net VBAT_BUS: 21.15,95.2 21.15,95.95 21.175,95.975 21,96.15 21,100.85 21.075,100.925 22.875,100.925 22.875,95.85 22.225,95.2
  region net 3V3_BUCK_IN: 46.925,71.85 46.925,76.6 45.325,76.6 45.3,76.625 45.05,76.375 45.05,70.7 45,70.65
  region net 3V3_BUCK_IN: 45,70.65 45,69.575 45.125,69.45 45.125,68.1 45.45,68.1 45.6,67.95 45.6,66.625 46.4,66.625 46.35,66.675 46.35,69.125 45.7,69.775 45.725,69.8 45.725,70.975 46.05,70.975 46.925,71.85
  region net VBAT_BUS: 21.65,94.475 21.725,93.775 21.725,92.825 22.175,92.825 22.175,91.35 23.663,91.35 23.638,93.775 22.225,93.775 22.225,95.2 21.15,95.2 21.15,94.55
GND (plane layer: these items are gaps in the copper):
  pour cut-out: 46.6,86.4 47.3,86.4 47.3,85.6 46.6,85.6
  pour cut-out: 5.6,87.85 6.4,87.85 6.4,87.15 5.6,87.15

## Silkscreen, mask and mechanical layers (free items; w line width, h text height)
Top Overlay:
  drawing of 2 lines, arcs and shapes, not listed
  text "D  R  I  V  E  W  I  R  E" at 55.5,115.925 h6 r180
  text "-" at 0.854,110.654 h1.1
  text "ON" at 51.396,104.329 h1.1 r90
  text "+" at 0.879,98.521 h1.1
  text "OFF" at 51.496,96.179 h1.1 r90
  text "Designed by" at 42.804,54.896 h1.4
  text "LO1" at 8.854,54.579 h1.1
  text "LO2" at 8.829,52.954 h1.1
  text "Marco Volpini" at 41.704,52.446 h1.4
  text "IO39" at 19.254,48.754 h1.1
  text "IO40" at 19.254,46.254 h1.1
  text "3V3" at 43.254,45.754 h1.1
  text "GND" at 53.254,45.754 h1.1
  text "RO1" at 8.779,44.254 h1.1
  text "IO41" at 19.254,43.754 h1.1
  text "GND" at 26.254,43.254 h1.1
  text "GND" at 35.754,43.254 h1.1
  text "3V3" at 43.254,43.254 h1.1
  text "GND" at 53.254,43.254 h1.1
  text "RO2" at 8.754,42.629 h1.1
  text "IO42" at 19.254,41.254 h1.1
  text "3V3" at 26.254,40.754 h1.1
  text "3V3" at 35.754,40.754 h1.1
  text "3V3" at 43.254,40.754 h1.1
  text "GND" at 53.254,40.754 h1.1
  text "3V3" at 19.254,38.754 h1.1
  text "SCL" at 26.254,38.254 h1.1
  text "SCL" at 35.754,38.254 h1.1
  text "3V3" at 43.254,38.254 h1.1
  text "GND" at 53.254,38.254 h1.1
  text "GND" at 19.254,36.254 h1.1
  text "SDA" at 26.254,35.754 h1.1
  text "SDA" at 35.754,35.754 h1.1
  text "3V3" at 43.254,35.754 h1.1
  text "GND" at 53.254,35.754 h1.1
  text "IO16" at 42.754,32.754 h1.1
  text "IO4" at 53.254,32.754 h1.1
  text "IO12" at 42.754,30.254 h1.1
  text "IO5" at 53.254,30.254 h1.1
  text "IO11" at 42.754,27.754 h1.1
  text "IO6" at 53.254,27.754 h1.1
Mechanical 1:
  circle w0.1: c42.1,119.5 r3.5
  circle w0.1: c19.25,119.5 r3.5
  circle w0.1: c10.75,4.5 r3.5
  circle w0.1: c50.6,4.5 r3.5
  lines w0.254: 75,155 75.057,154.943

## Text inside footprints (layer, text, board x,y; h text height)
J3: Top 3D Body "PCB EDGE" at 0.17,25.675 h0.41 r270